# Altium PCB Phaser.PcbDoc (part 9 of 16)
Units mm, origin at the board's own origin, x right, y up, seen from the top; angles counter-clockwise.
Board outline 161.99 x 100 mm, 6 copper layers (TopLayer, MidLayer1, MidLayer2, SignalLayer1, Internal Plane 1, BottomLayer), stack 1.528 mm thick; 1017 components, 665 nets, 3453 pads, 2223 vias.
Unrouted connection lines stored in the file: 1.
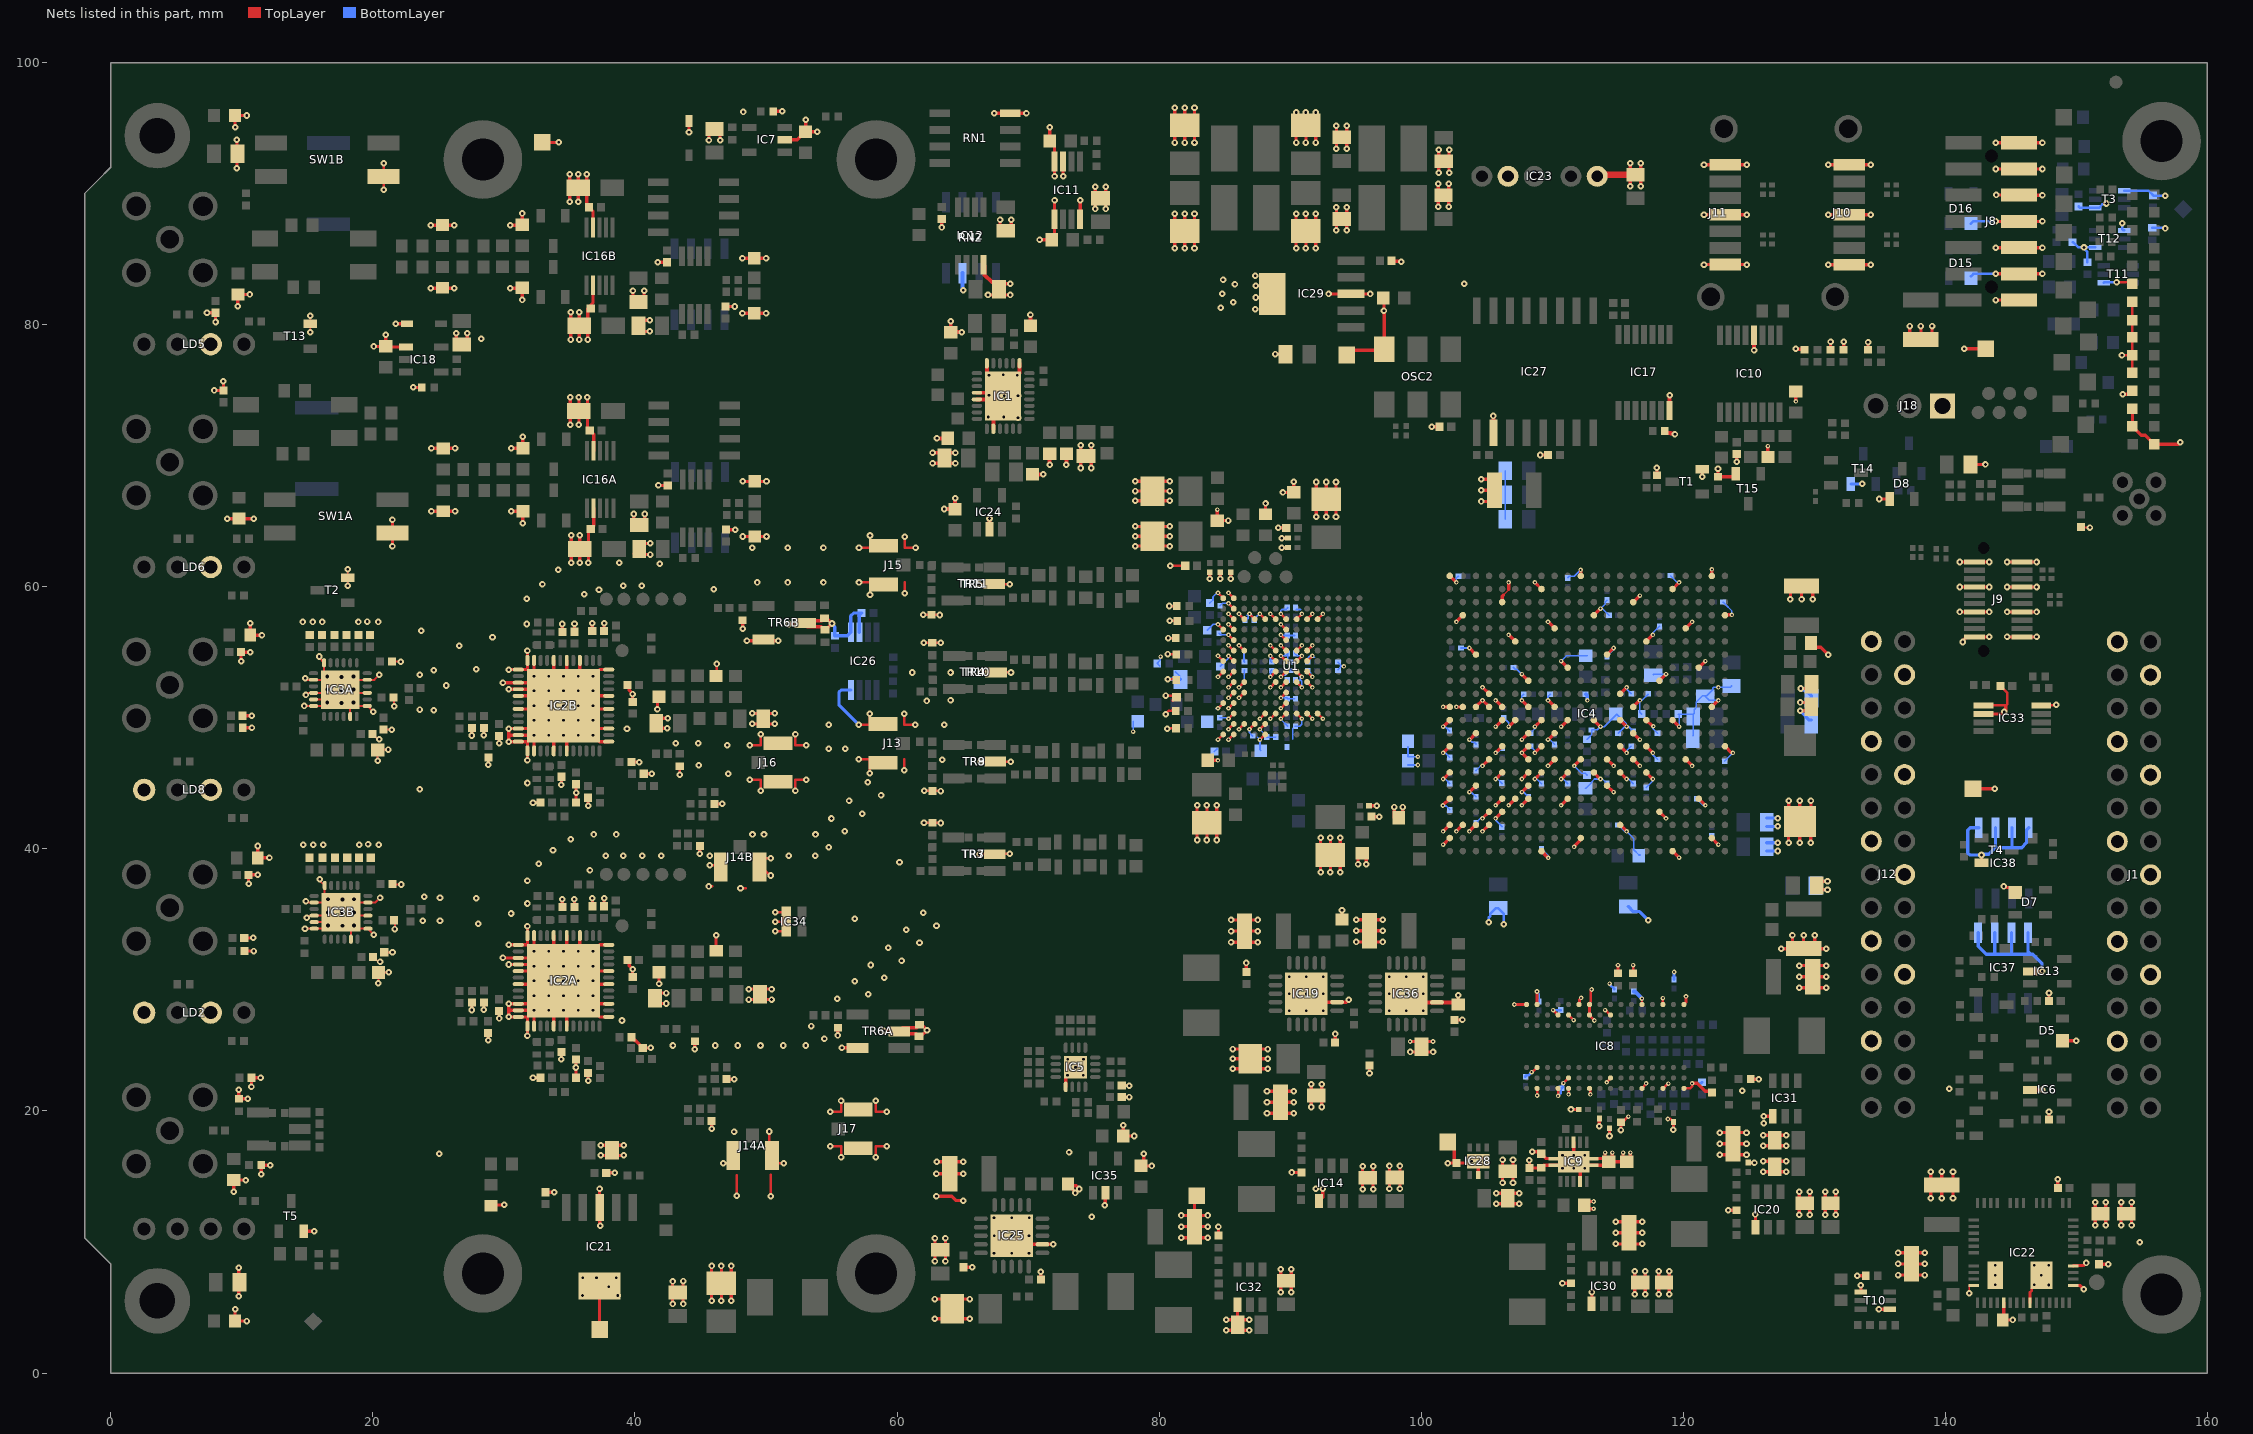
[diagram p11: the nets of this part, all layers, seen from the top]

## Via types
v1: diameter 0.5, hole 0.2, TopLayer to BottomLayer, tented both sides, 1374 vias
v2: diameter 0.35, hole 0.15, TopLayer to BottomLayer, tented both sides, 728 vias
v3: diameter 0.5, hole 0.2, TopLayer to BottomLayer, tented top, 96 vias
v4: diameter 0.6, hole 0.3, TopLayer to BottomLayer, 18 vias
v5: diameter 0.5, hole 0.2, TopLayer to BottomLayer, 5 vias
v6: diameter 0.35, hole 0.15, TopLayer to BottomLayer, 1 vias
v7: diameter 0.8, hole 0.5, TopLayer to BottomLayer, tented both sides, 1 vias

## Nets (pads, with @x,y where several pads share a name; then routed paths per layer and width w, separated by ;. In a path a pad name is that pad's centre, name@x,y a point inside that pad or via, vN(x,y) a via of type N, cw(c..) or ccw(c..) an arc to the next point about the centre after c; other vN are vias at no path point) (continued)
GND: C6.1 C7.1 C10.1 C11.2 C14A.1 C14B.1 C15A.1 C15B.1 C16A.1 C16B.1 C17.1 C18.1 C19.1 C20.1 C21.1 C22A.1 C22B.1 C23A.1 C23B.1 C24A.1 C24B.1 C25.2 C28.1 C30A.1 C30B.1 C31.2 C32.2 C33.2 C34.1 C35.2 C37.2 C38.1 C39.1 C40.1 C41.1 C42.1 C44A.1 C44B.1 C45A.1 C45B.1 C46A.1 C46B.1 C47.1 C48.1 C55.1 C56.1 C57.1 C58.1 C59.1 C60.1 C61.1 C62.1 C63.1 C64.1 C65.1 C66.1 C67.1 C68.1 C69.2 C70.1 C71.1 C72.1 C73.1 C74.1 C75.1 C76.1 C77.1 C78.1 C79.1 C82.1 C83.1 C84.1 C85.1 C86.1 C87.1 C88.1 C89.1 C90.1 C91.2 C92.1 C93.1 C94.1 C95.1 C96.1 C97.1 C98.1 C99.1 C100.1 C101.1 C102.1 C103.1 C104.1 C105.1 C106.1 C107.1 C108.1 C109.1 C110.1 C111.1 C112.1 C113.1 C114.1 C115.1 C116.1 C117.1 C118.1 C119.1 C120.1 C121.1 C122.1 C123.1 C124.1 C125.1 C126A.1 C126B.1 C127A.1 C127B.1 C128A.1 C128B.1 C129A.1 C129B.1 C130A.1 C130B.1 C131.1 C132.1 C134A.1 C134B.1 C139.1 C143.1 C144.1 C145.1 C146.1 C147.1 C148.1 C149.1 C153A.1 C153B.1 C154A.1 C154B.1 C155.1 C156.2 C158.1 C159.1 C160.2 C161.1 C162.1 C163.1 C164.1 C165.1 C166.1 C167.1 C168.1 C169.1 C170.1 C171.1 C172.1 C173.1 C174.1 C175.1 C176.1 C177.1 C178.1 C179.1 C180.2 C181.1 C182.1 C183.1 C184.2 C191.1 C195.1 C207.1 C208.1 C209.1 C210.1 C212.1 C213.1 C214.1 C215.1 C216.1 C217.1 C218.1 C219.1 C220.1 C221A.1 C221B.1 C223A.1 C223B.1 C224A.1 C224B.1 C225A.1 C225B.1 C227A.2 C227B.2 C228A.2 C228B.2 C229A.1 C229B.1 C230A.1 C230B.1 C231A.1 C231B.1 C232.1 C233.1 C234A.1 C234B.1 C235.1 C238.1 C239A.1 C239B.1 C240.1 C241A.1 C241B.1 C242.1 C243.2 C244.2 C245.1 C247.1 C248.1 C249.1 C250.2 C251.1 C252.1 C253.1 C255.2 C256.1 C257.1 C258.1 C259.1 C260.1 C262.1 C263.1 C264.1 C265.2 C266.1 C267.1 C268.1 C269.1 C271.1 C273A.1 C273B.1 C274A.1 C274B.1 C275A.1 C275B.1 C276A.1 C276B.1 C277A.1 C277B.1 C278.1 C279.1 C280A.1 C280B.1 C281A.2 C281B.2 C282A.1 C282B.1 C284A.1 C284B.1 C285A.1 C285B.1 C286A.1 C286B.1 C287A.1 C287B.1 C288A.1 C288B.1 C289A.1 C289B.1 C290.1 C291.1 C292.1 C293.1 C294.1 C295.1 C296.1 C297.1 C298.1 C299.1 C300.1 C301.2 C302.1 C303.1 C304.1 C305.2 C306.1 C307.1 C308.1 C309.1 C310.1 C311.1 C312.1 C313.1 C314.1 C315.1 C316.1 C317.1 C318.1 C319.2 C320.1 C321.1 C322.1 C323.1 C324.1 C325.1 C326.1 C327.1 C328.1 C329.1 C331.1 C332.1 C334.1 C335.1 C336.1 C337.1 C338.1 C339.1 C340.1 C342.1 C343.1 C344.1 C346.1 C347.1 C348.1 C349.1 C350.2 C351.1 C352.2 C353.1 C356A.1 C356B.1 C357A.1 C357B.1 C358A.1 C358B.1 C361.1 C364.2 C365.1 C366.1 C367.1 C371A.1 C371B.1 C372A.1 C372B.1 C373A.1 C373B.1 C374A.1 C374B.1 C375A.1 C375B.1 C376A.1 C376B.1 C377A.1 C377B.1 C1009.1 D3.1 D5.1 D6.2 D7.1 D8.1 D15.1 D16.1 IC1.4 IC1.5 IC1.10 IC1.23 IC1.28 IC1.29 IC2A.4 IC2A.6 IC2A.8 IC2A.11 IC2A.12 IC2A.13 IC2A.15 IC2A.16 IC2A.17 IC2A.19 IC2A.22 IC2A.23 IC2A.24 IC2A.25 IC2A.26 IC2A.29 IC2A.31 IC2A.37 IC2A.39 IC2A.42 IC2A.44 IC2A.48 IC2A.49 IC2B.4 IC2B.6 IC2B.8 IC2B.11 IC2B.12 IC2B.13 IC2B.15 IC2B.16 IC2B.17 IC2B.19 IC2B.22 IC2B.23 IC2B.24 IC2B.25 IC2B.26 IC2B.29 IC2B.31 IC2B.37 IC2B.39 IC2B.42 IC2B.44 IC2B.48 IC2B.49 IC3A.1 IC3A.3 IC3A.5 IC3A.12 IC3A.14 IC3A.16 IC3A.17 IC3A.18 IC3A.23 IC3A.25 IC3B.1 IC3B.3 IC3B.5 IC3B.12 IC3B.14 IC3B.16 IC3B.17 IC3B.18 IC3B.23 IC3B.25 IC4.A2 IC4.A3 IC4.A5 IC4.A7 IC4.A9 IC4.A11 IC4.A12 IC4.A22 IC4.AA2 IC4.AA12 IC4.AA22 IC4.AB9 IC4.AB19 IC4.B3 IC4.B12 IC4.B19 IC4.C3 IC4.C6 IC4.C10 IC4.C12 IC4.C16 IC4.D3 IC4.D4 IC4.D8 IC4.D12 IC4.D13 IC4.E4 IC4.E5 IC4.E7 IC4.E9 IC4.E11 IC4.E12 IC4.E20 IC4.F5 IC4.F11 IC4.F17 IC4.G5 IC4.G6 IC4.G7 IC4.G8 IC4.G9 IC4.G10 IC4.G12 IC4.G14 IC4.H1 IC4.H7 IC4.H9 IC4.H11 IC4.H21 IC4.J8 IC4.J10 IC4.J12 IC4.J18 IC4.K5 IC4.K7 IC4.K11 IC4.K15 IC4.L2 IC4.L8 IC4.L22 IC4.M7 IC4.M11 IC4.M19 IC4.N6 IC4.N8 IC4.N16 IC4.P3 IC4.P7 IC4.P9 IC4.P11 IC4.P13 IC4.R8 IC4.R10 IC4.R12 IC4.R20 IC4.T7 IC4.T9 IC4.T11 IC4.T17 IC4.U4 IC4.U14 IC4.V1 IC4.V11 IC4.V21 IC4.W8 IC4.W18 IC4.Y5 IC4.Y15 IC5.1 IC5.17 IC6.2 IC7.2 IC8.A9 IC8.B1 IC8.B3 IC8.B9 IC8.D1 IC8.D8 IC8.E1 IC8.E2 IC8.E8 IC8.F9 IC8.G1 IC8.G8 IC8.G9 IC8.J2 IC8.J8 IC8.M1 IC8.M9 IC8.P1 IC8.P9 IC8.T1 IC8.T9 IC9.4 IC9.8 IC9.11 IC10.4 IC11.3 IC11.4 IC11.5 IC11.8 IC12.4 IC13.2 IC14.1 IC16A.2 IC16A.9 IC16B.2 IC16B.9 IC17.7 IC18.1 IC19.12 IC19.21 IC20.1 IC21.3 IC21.6 IC22.26 IC22.31 IC22.35 IC22.42 IC22.45 IC22.53 IC22.54 IC23.1 IC23.4 IC24.2 IC25.12 IC25.21 IC26.4 IC26.5 IC26.6 IC27.10 IC28.5 IC28.7 IC29.3 IC29.6 IC30.1 IC31.1 IC32.1 IC33.4 IC33.5 IC33.6 IC34.3 IC35.2 IC36.12 IC36.21 IC37.1 IC37.2 IC37.3 IC37.4 IC38.1 IC38.2 IC38.3 IC38.4 J1.1 J1.4 J1.7 J1.10 J1.13 J1.16 J1.19 J1.22 J1.25 J8.1 J8.3 J8.5 J8.7 J8.9 J8.11 J8.13 J9.1 J9.2 J9.7 J9.8 J9.13 J9.14 J9.19 J9.20 J10.1 J10.4 J10.7 J11.1 J11.4 J11.7 J12.1 J12.4 J12.7 J12.10 J12.13 J12.16 J12.19 J12.22 J12.25 J13.2 J14A.2 J14B.2 J15.2 J16.2 J17.2 J18.1 L5.1 LD2.1 LD2.3 LD4.1 LD5.3 LD6.3 LD8.1 LD8.3 LD11.1 LD14.1 LD15.1 LD16.1 LD17.1 LD18.1 LD19.1 LD20.1 LD21.2 OSC2.3 R11.2 R12.2 R13.2 R14.1 R15.2 R16.2 R19.1 R21.2 R23.1 R24.2 R27.1 R31.2 R35.2 R36.2 R43.1 R48.1 R51A.1 R51B.1 R75.1 R80.1 R81.1 R87.2 R91.1 R122.1 R123.1 R124.1 R125.1 R126.1 R129.1 R135.2 R137A.1 R137B.1 R150.1 R151.1 R156.1 R157.1 R158.1 R159.1 R160.1 R161.1 R164.1 R168.1 R177.1 R178.1 R181.1 R184.2 R186.2 R189.2 R190.2 R192.2 R193A.1 R193B.1 R196A.1 R196B.1 R197.2 R199.2 R201.2 R203.1 R206.1 R209.1 R222.1 R226A.2 R226B.2 R238.1 R239.1 R241.2 R242.2 R243.2 R244.1 R250.1 R251.1 R253.1 R254.1 R256.1 R258.2 R261.2 R263.2 R264.2 R265.2 R266.2 R267.2 R268.2 RN1.4 RN2.7 SW1A.3 SW1B.3 T1.2 T2.2 T3.1 T3.4 T4.2 T5.2 T10.1 T10.4 T11.4 T12.1 T12.4 T13.2 T14.2 T15.2 TP12.1 TP17.1 TP19.1 TP20.1 TP21.1 TP22.1 TP23.1 TR3.2 TR4.2 TR5.2 TR6A.2 TR6A.4 TR6B.2 TR6B.4 TR7.2 TR8.2 TR9.2 TR10.2 TR11.2 U1.A10 U1.A13 U1.A14 U1.B10 U1.B11 U1.B12 U1.B13 U1.C5 U1.C6 U1.C7 U1.C8 U1.C9 U1.C10 U1.C13 U1.D8 U1.D13 U1.D14 U1.E8 U1.E12 U1.E13 U1.F6 U1.F7 U1.F8 U1.F9 U1.F12 U1.F13 U1.G6 U1.G7 U1.G8 U1.G9 U1.G13 U1.G14 U1.H6 U1.H7 U1.H8 U1.H9 U1.H13 U1.H14 U1.J6 U1.J7 U1.J8 U1.J9 U1.J12 U1.J13 U1.K8 U1.K13 U1.L8 U1.L13 U1.L14 U1.M5 U1.M6 U1.M7 U1.M8 U1.M9 U1.M10 U1.M11 U1.M12 U1.M13 U1.N13 U1.P13 U1.P14 | length 1164.1
  TopLayer w0.075: 106.277,59.381 106.681,59.784
  TopLayer w0.125: R196A.1@46.192,32.277 46.225,32.245 R196A.1@46.207,32.227 ; v2@103.689,48.296 v2@103.689,48.317 ; IC4.C10@104.175,48.804 IC4.C10@104.175,48.825 ; IC4.E20@106.175,58.825 IC4.E20@106.183,58.833 ; 112.045,40.587 112.045,40.593 ; IC8.M9@116.841,28.12 v2(116.841,28.57) ; v1(141.825,6.075) 141.825,6.7 141.85,6.675 IC22.26@142.15,6.675 ; R27.1@150.343,64.554 150.381,64.516 v1(151.025,64.516)
  TopLayer w0.127: v1(15.225,79.422) T13.2@15.225,80.052 v1(15.225,80.682) ; v1(18.079,60.063) T2.2@18.079,60.693 v1(18.079,61.323)
  TopLayer w0.152: v1@14.735,51.79 v1@14.75,51.775 ; v1@14.747,52.959 14.806,52.9 IC3A.14@15.475,52.9 16.037,52.9 ; v1(14.775,50.9) IC3A.18@15.475,50.9 16.275,50.9 v4(16.525,51.15) IC3A.25@16.775,51.4 ; v1@14.785,34.794 v1@14.8,34.779 ; v1@14.797,35.963 14.856,35.904 IC3B.14@15.525,35.904 16.087,35.904 ; v1(14.825,33.904) IC3B.18@15.525,33.904 16.325,33.904 v4(16.575,34.154) IC3B.25@16.825,34.404 ; v1(14.899,51.74) 14.785,51.74 v1@14.75,51.775 ; v1(14.949,34.744) 14.835,34.744 v1@14.8,34.779 ; IC3A.17@15.475,51.4 IC3A.25@16.775,51.4 ; IC3B.17@15.525,34.404 IC3B.25@16.825,34.404 ; v1(15.9,54.675) 15.9,54.575 IC3A.12@16.275,54.2 16.275,53.4 v4(16.525,53.15) IC3A.25@17.525,52.15 IC3A.25@17.55,52.125 ; v1(15.95,37.679) 15.95,37.579 IC3B.12@16.325,37.204 16.325,36.404 v4(16.575,36.154) IC3B.25@17.575,35.154 IC3B.25@17.6,35.129 ; IC3A.23@18.275,50.1 18.275,51.4 17.625,52.05 v4(17.625,52.125) ; IC3B.23@18.325,33.104 18.325,34.404 17.675,35.054 v4(17.675,35.129) ; 19.013,50.9 IC3A.1@19.575,50.9 v1(20.025,50.45) ; 19.013,51.9 IC3A.3@19.575,51.9 ; 19.063,33.904 IC3B.1@19.625,33.904 v1(20.075,33.454) ; 19.063,34.904 IC3B.3@19.625,34.904 ; C23A.1@19.975,48.75 20,48.75 v1@20.375,48.375 ; C23B.1@20.025,31.754 20.05,31.754 v1@20.425,31.379 ; v1(20.375,46.725) C277A.1@20.375,47.55 20.4,47.575 v1(21.175,47.575) ; v1(20.425,29.729) C277B.1@20.425,30.554 20.45,30.579 v1(21.225,30.579) ; v1@20.426,48.324 v1@20.375,48.375 ; v1@20.476,31.327 v1@20.425,31.379 ; v1(20.5,48.375) v1@20.375,48.375 ; v1(20.5,53.275) 20.125,52.9 IC3A.5@19.575,52.9 18.275,52.9 17.625,52.25 v4(17.625,52.125) ; v1(20.55,31.379) v1@20.425,31.379 ; v1(20.55,36.279) 20.175,35.904 IC3B.5@19.625,35.904 18.325,35.904 17.675,35.254 v4(17.675,35.129) ; C22A.1@20.825,49.1 v1(21.45,49.1) ; C22B.1@20.875,32.104 v1(21.5,32.104) ; C371A.1@21.45,54.3 21.475,54.275 v1(22.125,54.275) ; C371B.1@21.5,37.304 21.525,37.279 v1(22.175,37.279) ; C24A.1@21.575,51.55 21.625,51.5 v1(21.625,50.875) ; C24B.1@21.625,34.554 21.675,34.504 v1(21.675,33.879) ; R242.2@131.231,78.087 R242.2@131.236,78.091 ; v1@14.75,51.775 14.85,51.875 15.45,51.875 IC3A.16@15.475,51.9 IC3A.25@17.275,51.9 ; v1@14.8,34.779 14.9,34.879 15.5,34.879 IC3B.16@15.525,34.904 IC3B.25@17.325,34.904 ; IC3A.25@16.775,51.4 IC3A.25@17.275,51.9 ; IC3B.25@16.825,34.404 IC3B.25@17.325,34.904 ; IC3A.25@17.275,51.9 17.5,52.125 IC3A.25@17.55,52.125 ; IC3B.25@17.325,34.904 17.55,35.129 IC3B.25@17.6,35.129 ; IC3A.25@17.55,52.125 v4(17.625,52.125) ; IC3B.25@17.6,35.129 v4(17.675,35.129)
  TopLayer w0.19: v1(43.422,45.655) R226B.2@43.422,46.313 ; v1(45.623,37.129) 45.916,37.129 ; v1(45.718,38.754) J14B.2@46.554,38.754 ; R196B.1@46.199,53.182 46.244,53.227 v1(46.244,54.107) ; v1(46.739,16) J14A.2@47.575,16 ; J14A.2@47.563,16.737 J14A.2@47.575,16.725 ; v1(47.767,13.535) 47.767,15.082 ; v1(48.057,36.982) 48.457,36.982 ; v1(48.772,45.265) 49.608,45.265 v1(49.608,44.43) ; v1(48.772,47.905) 49.608,47.905 v1(49.608,48.741) ; J14B.2@49.504,38.754 50.294,37.964 v1(50.376,37.964) ; J14B.2@49.711,39.272 v1(50.37,39.272) ; J14A.2@50.25,17 v1(50.25,18.428) ; v1(50.37,13.495) 50.37,15.12 ; J14A.2@50.525,16 v1(51.361,16) ; v1(50.714,33.716) IC34.3@51.55,33.716 ; v1(50.714,34.441) IC34.3@51.55,34.441 ; v1(50.714,35.167) IC34.3@51.55,35.167 ; v1(52.248,44.43) 52.248,45.265 v1(53.084,45.265) ; v1(52.248,48.741) 52.248,47.905 v1(53.084,47.905) ; v1(54.891,17.305) 55.727,17.305 v1(55.727,16.469) ; v1(54.891,19.945) 55.727,19.945 v1(55.727,20.78) ; v1(57.076,46.826) 57.912,46.826 v1(57.912,45.771) ; v1(57.076,49.466) 57.912,49.466 v1(57.912,50.302) ; v1(57.1,60.326) 57.935,60.326 57.937,60.324 v1(57.937,59.385) ; v1(57.1,62.966) 57.935,62.966 57.937,62.968 v1(57.937,63.906) ; v1(58.367,16.469) 58.367,17.305 v1(59.203,17.305) ; v1(58.367,20.78) 58.367,19.945 v1(59.203,19.945) ; v1(60.552,45.991) 60.552,46.826 ; v1(60.552,50.302) 60.552,49.466 v1(61.388,49.466) ; v1(60.575,59.49) 60.575,60.326 ; v1(60.575,63.802) 60.575,62.966 v1(61.411,62.966) ; v1@62.002,57.848 R254.1@62.633,57.848 v1@63.265,57.848 ; v1@62.055,55.728 R253.1@62.686,55.728 v1@63.318,55.728 ; v1@62.064,41.974 R250.1@62.696,41.974 v1@63.327,41.974 ; v1@62.08,44.412 R251.1@62.712,44.412 v1@63.343,44.412 ; v1(66.255,60.198) TR5.2@67.424,60.198 v1(68.593,60.198) ; v1(66.292,39.587) TR3.2@67.461,39.587 67.498,39.624 v1(68.605,39.624) ; v1(66.333,46.648) TR9.2@67.502,46.648 v1(68.671,46.648) ; v1(66.359,53.455) TR4.2@67.528,53.455 v1(68.696,53.455) ; v1@80.467,50.267 80.721,50.52 R258.2@81.263,50.52 ; v1(80.518,51.697) 81.158,51.697 R264.2@81.303,51.552 ; v1(80.668,54.863) 81.255,54.863 R265.2@81.3,54.818 ; v1(80.67,52.934) 81.253,52.934 R263.2@81.315,52.872 ; v1@80.71,56.079 R266.2@81.272,56.079 ; v1@80.781,58.522 R267.2@81.343,58.522 ; v1@80.799,49.188 R184.2@81.279,49.188 ; v1@80.811,57.391 R268.2@81.373,57.391 ; v1@80.838,61.6 C290.1@81.993,61.6 ; R15.2@81.267,51.562 81.037,51.332 81.037,51.311 R264.2@81.277,51.552 ; IC33.5@142.9,50.94 144.61,50.94 144.722,51.051 144.722,51.904 C353.1@144.2,52.425 ; IC33.4@147.3,50.94 147.321,50.961 148.438,50.961 v1(148.459,50.982) ; v1(153.054,83.243) 154.139,83.243 LD14.1@154.267,83.115 ; v1(153.467,77.674) LD17.1@154.267,77.674 ; v1(153.493,87.736) v1@153.493,87.761 ; LD18.1@154.267,76.314 LD17.1@154.267,77.674 ; LD15.1@154.267,81.755 LD4.1@154.267,80.34 LD16.1@154.267,79.019 LD17.1@154.267,77.674
  TopLayer w0.2: v1(20.825,90.303) SW1B.3@20.825,91.309 v1(20.825,92.315) ; v1(21.498,63.084) SW1A.3@21.498,64.09 v1(21.498,65.096) ; v2(84.493,48.325) U1.A14@84.893,48.725 ; v2(84.493,50.725) U1.D14@84.893,51.125 ; v2(84.493,53.125) U1.G14@84.893,53.525 ; v2(84.493,54.725) U1.H14@84.893,54.325 ; v2(84.493,57.125) U1.L14@84.893,56.725 ; v2(84.493,59.525) U1.P14@84.893,59.125 ; v2(85.293,48.325) U1.A13@85.693,48.725 ; v2(85.293,49.125) U1.B13@85.693,49.525 ; v2(85.293,49.925) U1.C13@85.693,50.325 ; v2(85.293,50.725) U1.D13@85.693,51.125 ; v2(85.293,51.525) U1.E13@85.693,51.925 ; v2(85.293,52.325) U1.F13@85.693,52.725 ; v2(85.293,53.125) U1.G13@85.693,53.525 ; v2(85.293,54.725) U1.H13@85.693,54.325 ; v2(85.293,55.525) U1.J13@85.693,55.125 ; v2(85.293,56.325) U1.K13@85.693,55.925 ; v2(85.293,57.125) U1.L13@85.693,56.725 ; v2(85.293,57.925) U1.M13@85.693,57.525 ; v2(85.293,58.725) U1.N13@85.693,58.325 ; v2(85.293,59.525) U1.P13@85.693,59.125 ; v2(86.093,49.125) U1.B12@86.493,49.525 ; v2(86.093,51.525) U1.E12@86.493,51.925 ; v2(86.093,52.325) U1.F12@86.493,52.725 ; v2(86.093,55.525) U1.J12@86.493,55.125 ; v2(86.093,57.925) U1.M12@86.493,57.525 ; v2(86.893,49.125) U1.B11@87.293,49.525 ; v2(86.893,57.925) U1.M11@87.293,57.525 ; v2(87.693,48.325) U1.A10@88.093,48.725 ; v2(87.693,49.125) U1.B10@88.093,49.525 ; v2(87.693,49.925) U1.C10@88.093,50.325 ; v2(87.693,57.925) U1.M10@88.093,57.525 ; v2(88.493,49.925) U1.C9@88.893,50.325 ; v2(88.493,52.325) U1.F9@88.893,52.725 ; v2(88.493,53.125) U1.G9@88.893,53.525 ; v2(88.493,54.725) U1.H9@88.893,54.325 ; v2(88.493,55.525) U1.J9@88.893,55.125 ; v2(88.493,57.925) U1.M9@88.893,57.525 ; v2(89.293,49.925) U1.C8@89.693,50.325 ; v2(89.293,50.725) U1.D8@89.693,51.125 ; v2(89.293,51.525) U1.E8@89.693,51.925 ; v2(89.293,52.325) U1.F8@89.693,52.725 ; v2(89.293,53.125) U1.G8@89.693,53.525 ; v2(89.293,54.725) U1.H8@89.693,54.325 ; v2(89.293,55.525) U1.J8@89.693,55.125 ; v2(89.293,56.325) U1.K8@89.693,55.925 ; v2(89.293,57.125) U1.L8@89.693,56.725 ; v2(89.293,57.925) U1.M8@89.693,57.525 ; U1.C7@90.493,50.325 v2(90.893,49.925) ; U1.F7@90.493,52.725 v2(90.893,52.325) ; U1.G7@90.493,53.525 v2(90.893,53.125) ; U1.H7@90.493,54.325 v2(90.893,54.725) ; U1.J7@90.493,55.125 v2(90.893,55.525) ; U1.M7@90.493,57.525 v2(90.893,57.925) ; U1.C6@91.293,50.325 v2(91.693,49.925) ; U1.F6@91.293,52.725 v2(91.693,52.325) ; U1.G6@91.293,53.525 v2(91.693,53.125) ; U1.H6@91.293,54.325 v2(91.693,54.725) ; U1.J6@91.293,55.125 v2(91.693,55.525) ; U1.M6@91.293,57.525 v2(91.693,57.925) ; U1.C5@92.093,50.325 v2(92.493,49.925) ; U1.M5@92.093,57.525 v2(92.493,57.925) ; v2(107.098,28.12) IC8.A9@108.041,28.12 ; v2(108.429,22.963) 108.484,22.963 IC8.B3@108.841,23.32 ; IC8.B9@108.829,28.132 v2(108.829,29.113) ; v2(108.841,21.179) IC8.B1@108.841,21.72 ; v2(110.065,27.696) IC8.D8@110.441,27.32 ; v2(110.441,21.154) IC8.D1@110.441,21.72 ; v2(110.84,22.119) IC8.E2@111.241,22.52 ; v2(111.241,21.27) IC8.E1@111.241,21.72 ; IC8.E8@111.241,27.32 v2(111.633,26.928) ; IC8.F9@112.041,28.12 112.079,28.158 112.079,28.472 112.2,28.593 v2(112.2,28.634) ; v2(112.905,21.262) IC8.G1@112.905,21.656 ; v2(113.005,29.263) 112.944,29.203 112.944,28.331 112.835,28.222 112.835,28.126 IC8.G9@112.841,28.12 112.841,27.277 v2(113.215,26.903) ; v2(114.03,27.688) 114.051,27.688 114.419,27.32 IC8.J8@114.441,27.32 ; v2(114.155,22.176) 114.165,22.186 114.165,22.217 114.441,22.493 IC8.J2@114.441,22.52 ; R122.1@115.015,30.498 v2(115.015,31.128) ; R126.1@115.24,19.133 115.345,19.133 115.774,19.562 v2(115.805,19.562) ; R125.1@116.165,30.498 v2(116.165,31.128) ; IC8.M1@116.841,21.72 117.165,22.044 v2@117.165,22.101 ; IC8.P1@118.41,21.689 118.415,21.684 118.819,22.088 v2(118.855,22.088) ; IC8.P1@118.435,21.714 IC8.P1@118.441,21.72 ; IC8.P9@118.441,28.12 v2(118.441,28.602) ; v2@118.815,19.393 v2(118.825,19.383) 119.01,19.383 C171.1@119.24,19.153 C171.1@119.242,19.155 ; IC8.T1@120.041,21.72 120.504,21.72 120.665,21.881 v2(120.665,22.103) ; IC8.T9@120.09,28.169 120.205,28.284 v2(120.205,28.738) ; T4.2@142.75,38.925 v1(142.75,39.53) ; IC22.35@146.45,5.375 146.45,6.152 146.575,6.277 146.575,6.42
  TopLayer w0.25: v1(7.348,80.892) 7.352,80.896 7.994,80.896 7.998,80.892 v1(7.998,80.2) ; v1(7.909,74.975) C31.2@8.601,74.975 v1(8.601,75.667) ; v1(8.891,65.194) v1(10.914,65.194) R157.1@9.791,65.194 ; v1(9.39,13.822) R14.1@9.39,14.722 v1(10.29,14.722) ; v1(9.49,4.868) R161.1@9.49,3.968 v1(10.39,3.968) ; v1(9.49,95.056) R159.1@9.49,95.956 v1(10.39,95.956) ; v1(9.631,91.945) v1(9.631,94.105) ; v1(9.7,81.4) R156.1@9.7,82.3 v1(10.6,82.3) ; v1(9.775,5.859) v1(9.775,8.02) ; v1(9.775,21.612) R81.1@9.775,20.92 v1(10.467,20.92) ; v1(9.948,54.315) C34.1@9.948,55.007 v1(10.64,55.007) ; C33.2@10.065,50.15 v1(10.757,50.15) ; R151.1@10.085,49.236 v1(10.777,49.236) ; C41.1@10.191,33.2 v1(10.884,33.2) ; R75.1@10.211,32.2 v1(10.904,32.2) ; v1(10.52,37.322) C35.2@10.52,38.015 v1(11.212,38.015) ; v1(10.64,57.206) R158.1@10.64,56.306 v1(11.54,56.306) ; v1(10.74,21.836) C37.2@10.74,22.528 v1(11.433,22.528) ; v1(11.212,40.214) R160.1@11.212,39.314 v1(12.112,39.314) ; v1(11.49,15.173) R150.1@11.49,15.865 v1(12.182,15.865) ; T5.2@14.725,10.825 v1(15.525,10.825) ; v1(20.084,78.333) C252.1@20.984,78.333 ; v1(20.984,79.233) C252.1@20.984,78.333 ; v1(21.759,80.058) D3.1@22.609,80.058 ; IC18.1@22.534,78.283 21.034,78.283 C252.1@20.984,78.333 ; v1(23.084,75.208) R80.1@23.739,75.208 ; v1(24.425,82.78) v1(26.225,82.78) ; v1(24.425,87.58) v1(26.225,87.58) ; v1(24.475,65.755) R137A.1@25.375,65.755 v1(26.275,65.755) ; v1(24.475,70.555) R51A.1@25.375,70.555 v1(26.275,70.555) ; v1(26.359,79.328) 26.359,78.908 C366.1@26.784,78.483 ; C366.1@27.159,78.108 C366.1@26.784,78.483 ; C366.1@27.159,78.858 C366.1@26.784,78.483 ; v1(27.209,79.328) 27.209,78.908 C366.1@26.784,78.483 ; v1(27.555,27.702) C288A.1@27.555,28.264 ; v1(27.555,48.649) C288B.1@27.555,49.211 ; v1(28.475,27.713) C153A.1@28.475,28.275 ; v1(28.475,48.66) C153B.1@28.475,49.221 ; v1(28.798,25.384) C289A.1@28.798,25.945 ; v1(28.819,46.405) C289B.1@28.819,46.966 ; R87.2@29.017,12.766 29.079,12.827 v1(30.041,12.827) ; v1(29.637,48.058) C154B.1@29.637,48.619 ; v1(29.646,27.056) C154A.1@29.646,27.617 ; v1(29.93,31.675) IC2A.15@31.1,31.675 IC2A.49@34.3,31.675 ; v1(29.93,52.675) IC2B.15@31.1,52.675 IC2B.49@34.3,52.675 ; 30.375,27.675 IC2A.23@31.1,27.675 IC2A.49@31.798,27.675 ; v1(30.375,31.175) IC2A.16@31.1,31.175 IC2A.49@34.3,31.175 ; v1(30.375,32.675) IC2A.13@31.1,32.675 31.798,32.675 IC2A.49@32.121,32.352 ; v1(30.375,52.175) IC2B.16@31.1,52.175 IC2B.49@33.425,52.175 ; v1(30.375,53.675) IC2B.13@31.1,53.675 IC2B.49@31.798,53.675 ; v1(30.5,82.78) 31.4,82.78 v1(31.4,81.88) ; v1(30.5,87.58) 31.4,87.58 v1(31.4,88.48) ; v1(30.55,65.755) C225A.1@31.45,65.755 v1(31.45,64.855) ; v1(30.55,70.555) C221A.1@31.45,70.555 v1(31.45,71.455) ; IC2A.19@31.1,29.675 34.3,29.675 v3(34.55,29.925) ; IC2A.17@31.1,30.675 IC2A.49@34.3,30.675 ; IC2B.19@31.1,50.675 IC2B.49@34.3,50.675 ; IC2B.17@31.1,51.675 IC2B.49@34.3,51.675 ; IC2A.49@31.798,27.175 IC2A.24@31.1,27.175 v1(30.375,27.175) v1(30.375,28.175) IC2A.22@31.1,28.175 IC2A.49@31.798,28.175 ; IC2B.49@31.798,48.175 IC2B.24@31.1,48.175 v1(30.375,48.175) v1(30.375,49.175) ; IC2B.49@31.798,48.675 IC2B.23@31.1,48.675 30.375,48.675 v1(30.375,49.175) ; IC2B.49@31.798,49.175 IC2B.22@31.1,49.175 v1(30.375,49.175) ; v1(31.8,25.75) IC2A.25@31.8,26.475 IC2A.49@31.8,27.173 ; IC2A.49@31.8,32.677 IC2A.12@31.8,33.375 v1(31.8,34.1) ; v1(31.8,46.75) IC2B.25@31.8,47.475 IC2B.49@31.8,48.173 ; IC2B.49@31.8,53.677 IC2B.12@31.8,54.375 v1(31.8,55.1) ; v1(32.221,43.527) C358B.1@32.782,43.527 ; v1(32.222,22.528) C358A.1@32.783,22.528 ; IC2A.26@32.3,26.475 IC2A.49@32.3,27.173 ; IC2A.49@32.3,32.677 IC2A.11@32.3,33.375 ; IC2B.26@32.3,47.475 IC2B.49@32.3,48.173 ; IC2B.49@32.3,53.677 IC2B.11@32.3,54.375 ; TP12.1@32.927,93.904 v1(34.175,93.904) ; C267.1@33.169,13.791 v1(33.854,13.791) ; IC2A.29@33.8,26.475 IC2A.49@33.8,27.173 ; IC2A.49@33.8,32.677 IC2A.8@33.8,33.375 ; IC2B.29@33.8,47.475 IC2B.49@33.8,48.173 ; IC2B.49@33.8,53.677 IC2B.8@33.8,54.375 ; v1(34.39,23.941) C357A.1@34.39,24.503 ; v1(34.39,44.903) C357B.1@34.39,45.503 ; C134A.1@34.461,35.557 v1(34.461,36.157) ; C134B.1@34.461,56.557 v1(34.461,57.157) ; IC2A.31@34.8,26.475 IC2A.49@34.8,27.173 ; IC2A.49@34.8,32.677 IC2A.6@34.8,33.375 ; IC2B.31@34.8,47.475 IC2B.49@34.8,48.173 ; IC2B.49@34.8,53.677 IC2B.6@34.8,54.375 ; v1(35.025,89.385) v1(35.025,91.475) ; v1(35.075,72.36) v1(35.075,74.45) ; v1(35.1,78.86) v1(35.1,80.95) ; v1(35.15,61.835) v1(35.15,63.925) ; C45A.1@35.382,35.557 v1(35.382,36.157) ; C45B.1@35.391,56.566 v1(35.391,57.166) ; C127A.1@35.5,23.915 v1(35.5,23.315) 35.51,23.305 C356A.1@35.51,22.533 ; C356B.1@35.51,43.533 v1(35.509,44.275) ; v1(35.509,44.275) C127B.1@35.509,44.875 ; v1(35.675,89.385) C228B.2@35.675,90.43 v1(35.675,91.475) ; v1(35.725,72.36) C228A.2@35.725,73.405 v1(35.725,74.45) ; v1(35.75,78.86) C231B.1@35.75,79.905 v1(35.75,80.95) ; IC2A.49@35.8,32.677 IC2A.4@35.8,33.375 ; IC2B.49@35.8,53.677 IC2B.4@35.8,54.375 ; v1(35.8,61.835) C231A.1@35.8,62.88 v1(35.8,63.925) ; v1(36.325,91.475) 36.325,89.13 C229B.1@36.5,88.955 36.8,88.655 IC16B.9@36.8,87.405 ; v1(36.375,74.45) 36.375,72.105 C229A.1@36.55,71.93 36.85,71.63 IC16A.9@36.85,70.38 ; v1(36.4,78.86) 36.4,81.205 C230B.1@36.575,81.38 ; v1(36.424,22.297) C128A.1@36.424,22.897 ; v1(36.424,43.297) C128B.1@36.424,43.897 ; v1(36.45,61.835) 36.45,64.18 C230A.1@36.625,64.355 ; C230B.1@36.575,81.43 36.8,81.655 IC16B.2@36.8,83.005 ; C230A.1@36.625,64.405 36.85,64.63 IC16A.2@36.85,65.98 ; C130B.1@36.748,56.607 v1(36.748,57.208) ; C130A.1@36.754,35.614 v1(36.754,36.214) ; v1(37.3,14.05) IC21.3@37.3,12.639 37.323,12.616 37.323,11.248 v1(37.346,11.225) ; TP19.1@37.302,3.323 IC21.6@37.302,6.359 ; IC2A.49@37.302,27.175 IC2A.37@38,27.175 ; IC2A.49@37.302,28.175 IC2A.39@38,28.175 ; IC2A.49@37.302,29.675 IC2A.42@38,29.675 ; IC2A.49@37.302,30.675 IC2A.44@38,30.675 ; IC2A.49@37.302,32.675 IC2A.48@38,32.675 ; IC2B.49@37.302,48.175 IC2B.37@38,48.175 ; IC2B.49@37.302,49.175 IC2B.39@38,49.175 ; IC2B.49@37.302,50.675 IC2B.42@38,50.675 ; IC2B.49@37.302,51.675 IC2B.44@38,51.675 ; IC2B.49@37.302,53.675 IC2B.48@38,53.675 ; v1(37.385,16.606) v1(39.135,16.606) ; v1(37.385,17.39) v1(39.135,17.39) ; C129A.1@37.648,35.62 v1(37.648,36.22) ; C129B.1@37.648,56.62 v1(37.648,57.22) ; C266.1@37.81,15.275 v1(38.451,15.275) ; C126A.1@39.421,31.511 39.571,31.361 39.571,31.082 39.818,30.836 39.818,30.462 39.95,30.33 C44A.1@39.835,30.215 ; C126B.1@39.421,52.511 39.571,52.361 39.571,52.082 39.818,51.836 v1(39.818,51.811) 39.818,51.462 39.95,51.33 C44B.1@39.835,51.215 ; C286A.1@39.727,25.619 39.912,25.434 39.972,25.434 40.073,25.333 40.095,25.333 40.22,25.208 40.22,25.185 C287A.1@40.596,24.809 v1(41.196,24.809) ; C286B.1@39.727,46.619 v1(40.327,46.619) ; v1(39.85,82.575) 39.85,82.155 C223B.1@40.275,81.73 40.7,82.155 v1(40.7,82.575) ; v1(39.9,65.55) 39.9,65.13 C223A.1@40.325,64.705 40.75,65.13 v1(40.75,65.55) ; C234B.1@39.9,79.53 C234B.1@40.275,79.905 ; C234A.1@39.95,62.505 C234A.1@40.325,62.88 ; C234B.1@40.65,79.53 C234B.1@40.275,79.905 ; C287B.1@40.676,45.729 v1(41.276,45.729) ; C234A.1@40.7,62.505 C234A.1@40.325,62.88 ; v1(41.12,79.48) 40.7,79.48 C234B.1@40.275,79.905 ; v1(41.12,80.33) 40.7,80.33 C234B.1@40.275,79.905 ; v1(41.17,62.455) 40.75,62.455 C234A.1@40.325,62.88 ; v1(41.17,63.305) 40.75,63.305 C234A.1@40.325,62.88 ; C285A.1@41.527,28.196 v1(42.377,28.196) ; C285A.1@41.527,28.996 v1(42.377,28.996) ; C285B.1@41.625,49.193 v1(42.475,49.193) ; C285B.1@41.649,49.97 v1(42.499,49.97) ; v1(41.719,50.661) C282B.1@41.719,51.532 ; v1(41.745,84.755) C241B.1@42.45,84.755 ; v1(41.795,67.73) C241A.1@42.5,67.73 ; v1(41.839,29.719) C282A.1@41.839,30.59 ; v1(42.875,5.27) v1@42.875,7.02 ; v1(43.675,5.27) v1(43.675,7.02) ; v1(44.125,94.675) D6.2@44.125,95.525 ; v1(44.575,24.705) R226A.2@44.575,25.305 ; v1(44.954,39.629) C30B.1@44.954,40.229 ; v1(45.65,94.08) 45.65,94.5 C179.1@46.075,94.925 ; C179.1@45.7,94.55 C179.1@46.075,94.925 ; C179.1@45.7,95.3 C179.1@46.075,94.925 ; v1(45.848,5.521) v1(45.848,8.171) ; v1(45.854,18.629) C30A.1@45.854,19.229 ; C46B.1@46.066,43.425 v1(46.666,43.425) ; R196A.1@46.192,32.277 v1(46.192,33.392) ; v1(46.5,94.08) 46.5,94.5 C179.1@46.075,94.925 ; v1(46.598,5.521) C156.2@46.598,6.846 v1(46.598,8.171) ; C239B.1@46.9,81.38 v1(47.605,81.38) ; C239A.1@46.95,64.355 v1(47.655,64.355) ; C46A.1@46.991,22.425 v1(47.591,22.425) ; v1(47.348,5.521) v1(47.348,8.171) ; v1(48.204,80.873) C227B.2@49.104,80.873 v1(50.004,80.873) ; v1(48.204,85.073) C224B.1@49.104,85.073 v1(50.004,85.073) ; v1(48.24,63.833) C227A.2@49.14,63.833 v1(50.04,63.833) ; v1(48.24,68.033) C224A.1@49.14,68.033 v1(50.04,68.033) ; v1(48.548,55.871) v1(50.922,55.871) ; v1(48.699,28.498) v1(50.425,28.498) ; v1(48.699,29.298) v1(50.425,29.298) ; v1(48.944,49.532) v1(50.669,49.532) ; v1(48.944,50.332) v1(50.669,50.332) ; R23.1@50.545,96.275 v1(51.25,96.275) ; IC7.2@51.425,94.1 52.4,94.1 C245.1@53.025,94.725 ; v1(51.74,57.154) TR6B.2@52.927,57.154 ; TR6B.2@52.968,57.263 TR6B.2@52.987,57.243 ; v1(53.025,95.625) C245.1@53.025,94.725 ; v1(53.925,94.725) C245.1@53.025,94.725 ; v1(55.798,24.829) TR6A.4@56.985,24.829 ; v1(58.99,26.111) TR6A.2@60.177,26.111 ; v1(62.709,69.427) v1(64.459,69.427) ; v1(62.709,70.227) v1(64.459,70.227) ; v1(62.891,4.145) v1(65.541,4.145) ; v1(62.891,5.645) v1(65.541,5.645) ; v1(62.895,8.527) v1(62.895,10.277) ; v1(63.007,13.495) 64.186,13.495 64.524,13.157 v1(65.049,13.157) ; v1(63.007,15.2) C257.1@64.025,15.2 v1(65.043,15.2) ; v1(63.017,16.129) v1(65.049,16.129) ; v1(63.695,8.527) v1(63.695,10.277) ; C160.2@65.075,8.075 v1(65.75,8.075) ; v1(66.94,82.262) C86.1@67.36,82.262 ; C89.1@67.86,87.587 v1(67.86,88.007) ; C86.1@68.21,82.262 v1(68.63,82.262) ; C86.1@68.21,83.112 v1(68.63,83.112) ; C89.1@68.71,87.587 v1(68.71,88.007) ; v3(68.75,10.475) 69.4,9.825 IC25.12@71.1,9.825 v1(71.925,9.825) ; v1(70.875,86.475) C85.1@71.795,86.475 72.02,86.7 IC11.5@72.02,88.05 v1(72.02,89.48) ; C256.1@70.975,7.075 v1(70.975,7.725) ; v1(71.645,95.045) C84.1@71.645,94.025 72.02,93.65 IC11.4@72.02,92.45 v1(72.02,91.33) ; v1(72.67,91.33) IC11.3@72.67,92.45 ; IC5.1@72.868,21.835 72.868,22.585 v3(73.618,23.335) ; R168.1@73.05,14.425 R168.1@73.186,14.289 ; v1(73.611,13.742) 73.611,13.809 73.375,14.045 73.375,14.1 R168.1@73.186,14.289 ; v1(73.914,14.045) 73.67,14.289 R168.1@73.186,14.289 ; IC11.8@73.97,88.05 v1(73.97,89.48) ; v1(74.023,69.059) v1(74.023,70.809) ; v1(74.823,69.059) v1(74.823,70.809) ; v1(75.125,88.825) v1(75.125,90.525) ; v1(75.858,12.817) 75.881,12.839 75.881,13.74 IC35.2@75.904,13.763 ; v1(75.925,88.825) v1(75.925,90.525) ; C123.1@77.143,21.06 v1(77.718,21.06) ; C131.1@77.143,21.935 v1(77.718,21.935) ; v1(77.268,18.913) C340.1@77.268,18.088 v1(78.093,18.088) ; v1(78.168,63.1) v1(80.816,63.1) ; v1(78.168,63.85) v1(80.816,63.85) ; v1(78.168,64.6) v1(80.816,64.6) ; v1(78.168,66.55) v1(80.816,66.55) ; v1(78.168,67.3) v1(80.816,67.3) ; v1(78.168,68.05) v1(80.816,68.05) ; C339.1@78.619,15.822 C339.1@78.822,15.822 ; v1(78.822,16.725) C339.1@78.822,15.822 ; v1(79.444,15.8) 78.845,15.8 C339.1@78.822,15.822 ; v1(81.2,85.817) v1(81.2,88.467) ; v1(81.2,93.892) v1(81.2,96.542) ; v1(81.687,10.327) v1(83.723,10.327) ; v1(81.687,11.176) C348.1@82.705,11.176 v1(83.723,11.176) ; v1(81.687,12.025) C348.1@82.7,12.025 ; v1(81.95,85.817) C365.1@81.95,87.142 v1(81.95,88.467) ; v1(81.95,93.892) C364.2@81.95,95.217 v1(81.95,96.542) ; C348.1@82.7,11.349 C348.1@82.7,12.025 ; TP23.1@82.7,13.125 C348.1@82.7,12.025 ; v1(82.7,85.817) v1(82.7,88.467) ; v1(82.7,93.892) v1(82.7,96.542) ; C348.1@82.83,11.765 C348.1@82.83,12.025 ; v1(82.894,40.675) v1(82.894,43.325) ; v1(83.644,40.675) C305.2@83.644,42 v1(83.644,43.325) ; C306.1@83.718,46.75 v2(84.483,46.75) ; v1(83.723,12.025) C348.1@82.83,12.025 ; v1(83.862,60.606) C147.1@83.862,61.106 ; v1(84.394,40.675) v1(84.394,43.325) ; v2(84.443,65.875) C271.1@84.443,65.05 v1(85.268,65.05) ; R201.2@84.525,10.495 v1(84.525,11.176) ; v1(84.663,60.606) C158.1@84.663,61.106 ; v1(85.125,3.275) v1(86.875,3.275) ; v1(85.125,4.075) v1(86.875,4.075) ; v1(85.462,60.606) C159.1@85.462,61.106 ; v1(85.486,32.873) v1(87.522,32.873) ; v1(85.486,33.722) C269.1@86.504,33.722 v1(87.522,33.722) ; v1(85.486,34.571) v1(87.522,34.571) ; v1(85.629,23.222) v1(88.279,23.222) ; v1(85.629,23.972) C350.2@86.954,23.972 v1(88.279,23.972) ; v1(85.629,24.722) v1(88.279,24.722) ; C347.1@85.975,4.075 IC32.1@85.975,5.2 ; C265.2@86.654,30.597 v1(86.654,31.292) ; R36.2@88.12,65.527 v1(88.12,66.352) ; v1(88.232,19.814) v1(90.268,19.814) ; v1(88.232,20.663) C264.1@89.25,20.663 v1(90.268,20.663) ; v1(88.232,21.511) v1(90.268,21.511) ; v1(88.857,77.754) C42.1@89.743,77.754 ; v1(89.097,64.491) C303.1@89.697,64.491 ; v1(89.275,6.175) v1(89.275,7.925) ; v1(89.347,62.983) C291.1@89.847,62.983 ; v1(89.347,63.708) C297.1@89.847,63.708 ; v1(89.447,67.191) C302.1@90.272,67.191 v1(90.272,68.016) ; v1(90.075,6.175) v1(90.075,7.925) ; v1(90.105,15.305) R135.2@90.875,15.305 ; v1(90.45,85.817) v1(90.45,88.467) ; v1(90.45,93.892) v1(90.45,96.189) ; v1(91.2,85.817) C251.1@91.2,87.142 v1(91.2,88.467) ; v1(91.2,93.892) v1(91.2,96.189) ; v3(91.229,28.947) 91.879,28.297 IC19.12@93.579,28.297 94.279,28.297 v1(94.454,28.472) ; v1(91.6,20.3) v1(91.6,22.05) ; v1(91.95,85.817) v1(91.95,88.467) ; v1(91.95,93.892) v1(91.95,96.189) ; v1(91.997,65.341) v1(91.997,67.991) ; IC14.1@92.2,13.125 92.477,13.402 v1(92.477,14.075) ; v1(92.32,38.205) v1(92.32,40.855) ; v1(92.4,20.3) v1(92.4,22.05) ; v1(92.747,65.341) C301.2@92.747,66.666 v1(92.747,67.991) ; v1(92.927,82.339) IC29.3@93.777,82.339 ; v1(93.07,38.205) C319.2@93.07,39.53 v1(93.07,40.855) ; C367.1@93.429,25.222 v1(93.429,25.872) ; v1(93.497,65.341) v1(93.497,67.991) ; v1(93.525,87.192) v1(93.525,88.942) ; v1(93.525,93.417) v1(93.525,95.167) ; v1(93.82,38.205) v1(93.82,40.855) ; v1(93.955,35.306) 93.955,34.607 R181.1@93.961,34.6 ; v1(94.325,87.192) v1(94.325,88.942) ; v1(94.325,93.417) v1(94.325,95.167) ; TP20.1@94.5,78.034 96.923,78.034 97.18,78.291 v1@97.18,81.047 ; IC29.3@94.627,82.339 v1(96.113,82.339) ; v1(95.032,32.894) v1(97.068,32.894) ; v1(95.032,33.742) C191.1@96.05,33.742 v1(97.068,33.742) ; v1(95.032,34.591) v1(97.068,34.591) ; v1(95.177,38.83) C320.1@95.177,39.655 ; v1(95.525,14.025) v1(95.525,15.775) ; v1(95.813,38.83) C320.1@95.813,39.655 ; C313.1@96.02,43.28 v1(96.618,43.28) ; v1(96.05,22.861) C69.2@96.05,23.479 ; C321.1@96.195,42.455 v1(96.793,42.455) ; v1(96.325,14.025) v1(96.325,15.775) ; C361.1@97.108,82.023 97.153,82.068 v1(97.153,81.047) ; v1(97.575,14.05) v1(97.575,15.8) ; C161.1@97.739,84.877 97.78,84.836 98.44,84.836 v1(98.481,84.795) ; C101.1@97.95,42.363 v1(97.95,43.188) ; v1(98.375,14.05) v1(98.375,15.8) ; C101.1@98.585,42.363 v1(98.585,43.188) ; v1(99.15,24.5) v1(100.9,24.5) ; v2(99.15,25.3) v2(100.9,25.3) ; v1(100.787,72.207) C238.1@101.385,72.207 ; v1(101.3,88.992) v1(101.3,90.742) ; v1(101.325,91.592) v1(101.325,93.342) ; v2(101.651,43.307) 101.654,43.307 102.172,43.825 IC4.A5@102.175,43.825 ; v2(101.675,40.325) IC4.A2@102.175,40.825 ; v2(101.675,41.325) IC4.A3@102.175,41.825 ; v2(101.675,45.325) IC4.A7@102.175,45.825 ; v2(101.675,47.325) IC4.A9@102.175,47.825 ; v2(101.675,49.325) IC4.A11@102.175,49.825 ; v2(101.675,50.825) IC4.A12@102.175,50.825 ; TP17.1@102.026,17.627 102.525,17.128 102.525,16.173 C332.1@102.678,16.02 ; v1(102.033,16.02) C332.1@102.678,16.02 ; v1(102.1,88.992) v1(102.1,90.742) ; v1(102.125,91.592) v1(102.125,93.342) ; IC4.A22@102.175,60.825 v2(102.675,60.325) ; C195.1@102.525,26.946 v1(103.143,26.946) ; v2(102.675,41.325) IC4.B3@103.175,41.825 ; v2(102.675,50.825) IC4.B12@103.175,50.825 ; v2(102.675,57.325) IC4.B19@103.175,57.825 ; R256.1@102.825,28.132 v1(102.825,28.831) ; v2(103.675,41.325) IC4.C3@104.175,41.825 ; v2(103.675,44.325) IC4.C6@104.175,44.825 ; v2(103.675,55.325) IC4.C16@104.175,54.825 ; v2@103.689,48.317 IC4.C10@104.175,48.804 ; IC4.C12@104.175,50.825 v2(104.675,51.325) IC4.D12@105.175,50.825 ; IC28.5@104.353,15.12 IC28.7@104.353,16.162 104.212,16.02 C332.1@102.678,16.02 ; v1(104.569,66.506) C218.1@105.586,66.506 ; v1(104.569,67.355) C218.1@105.586,67.355 ; v1(104.569,68.204) C218.1@105.586,68.204 ; v2(104.675,41.325) IC4.D3@105.175,41.825 ; v2(104.675,42.325) IC4.D4@105.175,42.825 ; v2(104.675,46.325) IC4.D8@105.175,46.825 ; v2(104.675,52.325) IC4.D13@105.175,51.825 ; v2(105.675,42.325) IC4.E4@106.175,42.825 ; v2(105.675,43.325) IC4.E5@106.175,43.825 ; v2(105.675,45.325) IC4.E7@106.175,45.825 ; v2(105.675,47.325) IC4.E9@106.175,47.825 ; v2(105.675,49.325) IC4.E11@106.175,49.825 ; v2(105.675,51.325) IC4.E12@106.175,50.825 ; v1(105.728,12.928) v1(107.478,12.928) ; v1(105.728,13.728) v1(107.478,13.728) ; IC4.E20@106.183,58.833 106.183,59.272 106.285,59.373 ; v1(106.203,14.526) v1(106.203,16.276) ; v2(106.675,43.325) IC4.F5@107.175,43.825 ; v2(106.675,49.325) IC4.F11@107.175,49.825 ; v2(106.675,56.325) IC4.F17@107.175,55.825 ; 106.675,59.79 v2(106.675,60.325) ; v1(107.003,14.526) v1(107.003,16.276) ; v2(107.675,43.325) IC4.G5@108.175,43.825 ; v2(107.675,44.325) IC4.G6@108.175,44.825 ; v2(107.675,45.325) IC4.G7@108.175,45.825 ; v2(107.675,48.325) IC4.G10@108.175,48.825 ; v2(107.675,51.325) IC4.G12@108.175,50.825 ; v2(107.675,53.325) IC4.G14@108.175,52.825 ; IC4.G8@108.175,46.825 v2(107.675,47.325) IC4.G9@108.175,47.825 ; v1(108.253,16.242) C175.1@108.253,15.637 109.133,15.637 R129.1@109.153,15.657 109.358,15.862 IC9.11@110.078,15.862 111.378,15.862 IC9.11@111.628,16.112 ; v1(108.478,16.887) C172.1@109.128,16.887 ; v2(108.675,45.325) IC4.H7@109.175,45.825 ; v2(108.675,47.325) IC4.H9@109.175,47.825 ; v2(108.675,49.325) IC4.H11@109.175,49.825 ; v2(108.675,60.325) IC4.H21@109.175,59.825 ; v1(109.077,70.05) C278.1@109.675,70.05 ; C172.1@109.153,16.737 109.528,16.362 IC9.11@110.078,16.362 111.378,16.362 IC9.11@111.628,16.112 ; v2(109.675,46.325) IC4.J8@110.175,46.825 ; v2(109.675,48.325) IC4.J10@110.175,48.825 ; v2(109.675,51.325) IC4.J12@110.175,50.825 ; v2(109.675,57.325) IC4.J18@110.175,56.825 ; v2(110.675,43.325) IC4.K5@111.175,43.825 ; v2(110.675,45.325) IC4.K7@111.175,45.825 ; v2(110.675,49.325) IC4.K11@111.175,49.825 ; v2(110.675,54.325) IC4.K15@111.175,53.825 ; v1(110.775,6.855) R199.2@111.425,6.855 ; v1(111.425,20.111) C163.1@112.017,20.111 ; IC9.8@111.628,17.612 IC9.11@111.628,16.112 ; v2(111.663,40.15) 111.663,40.205 112.045,40.587 ; v2(111.675,46.325) IC4.L8@112.175,46.825 ; 112.045,40.593 112.175,40.724 IC4.L2@112.175,40.825 ; C176.1@112.128,12.812 C176.1@112.453,12.487 ; IC9.4@112.128,14.612 112.128,15.612 111.878,15.862 IC9.11@113.178,15.862 114.053,15.862 C174.1@114.303,16.112 ; v2(112.169,61.287) 112.169,60.831 IC4.L22@112.175,60.825 ; C176.1@112.728,12.537 v2(113.153,12.537) ; C176.1@112.728,13.087 v2(113.153,13.087) ; IC8.G1@112.841,21.72 IC8.G1@112.905,21.656 ; IC30.1@113.025,5.275 v1(113.025,6.175) ; IC4.M7@113.175,45.825 v2(113.675,45.325) ; IC4.M11@113.175,49.825 v2(113.675,49.325) ; IC4.M19@113.175,57.825 v2(113.675,58.325) ; v1(113.592,18.82) C177.1@113.592,19.411 ; C174.1@114.028,16.387 v2(114.028,16.812) ; IC4.N6@114.175,44.825 v2(114.675,44.325) ; IC4.N8@114.175,46.825 v2(114.675,46.325) ; IC4.N16@114.175,54.825 v2(114.675,55.325) ; v1(114.365,18.087) C169.1@114.365,18.678 ; C174.1@114.578,16.387 v2(114.578,16.812) ; v1(114.832,9.851) v1(116.868,9.851) ; v1(114.832,10.7) C344.1@115.85,10.7 v1(116.868,10.7) ; v1(114.832,11.549) v1(116.868,11.549) ; IC4.P3@115.175,41.825 v2(115.675,41.325) ; IC4.P7@115.175,45.825 v2(115.675,45.325) ; IC4.P9@115.175,47.825 v2(115.675,47.325) ; IC4.P11@115.175,49.825 v2(115.675,49.325) ; IC4.P13@115.175,51.825 v2(115.675,52.325) ; v1(115.24,18.542) R126.1@115.24,19.133 ; C173.1@115.403,16.387 v2(115.403,16.812) ; C173.1@115.628,15.862 C173.1@115.653,15.837 ; v1(115.95,90.567) v1(115.95,92.317) ; v2(115.953,16.812) 115.953,16.387 C173.1@115.678,16.112 C174.1@114.303,16.112 ; IC4.R8@116.175,46.825 v2(116.675,46.325) ; IC4.R10@116.175,48.825 v2(116.675,48.325) ; IC4.R12@116.175,50.825 v2(116.675,51.325) ; IC4.R20@116.175,58.825 v2(116.675,59.325) ; v1(116.3,6.025) v1(116.3,7.775) ; v1(116.75,90.567) v1(116.75,92.317) ; v1(117.1,6.025) v1(117.1,7.775) ; IC4.T7@117.175,45.825 v2(117.675,45.325) ; IC4.T9@117.175,47.825 v2(117.675,47.325) ; IC4.T11@117.175,49.825 117.648,49.352 v2(117.706,49.352) ; IC4.T17@117.175,55.825 v2(117.675,56.325) ; R43.1@117.984,68.49 v1(117.984,69.088) ; v1(118.125,6.025) v1(118.125,7.775) ; IC4.U4@118.175,42.825 v2(118.675,42.325) ; IC4.U14@118.175,52.825 v2(118.675,53.325) ; v1(118.925,6.025) v1(118.925,7.775) ; IC4.V1@119.175,39.825 v2(119.675,39.325) ; IC4.V11@119.175,49.825 v2(119.675,49.325) ; IC4.V21@119.175,59.825 v2(119.675,60.325) ; v1(119.242,18.564) C171.1@119.242,19.155 ; IC4.W8@120.175,46.825 v2(120.675,46.325) ; IC4.W18@120.175,56.825 v2(120.675,57.325) ; v2(120.665,22.103) 121.05,22.103 121.657,21.496 122.108,21.496 R123.1@122.195,21.409 R123.1@122.03,21.244 ; IC4.Y5@121.175,43.825 v2(121.675,43.325) ; IC4.Y15@121.175,53.825 v2(121.675,54.325) ; v1(121.445,68.377) T1.2@121.445,68.975 ; v1(121.575,84.58) J11.1@123.2,84.58 v1(124.825,84.58) ; v1(121.575,88.39) J11.4@123.2,88.39 v1(124.825,88.39) ; v1(121.575,92.2) J11.7@123.2,92.2 v1(124.825,92.2) ; v2(122.172,61.325) 122.172,60.828 IC4.AA22@122.175,60.825 ; IC4.AA2@122.175,40.825 v2(122.675,40.325) ; IC4.AA12@122.175,50.825 v2(122.675,51.325) ; v1(122.645,68.993) R190.2@122.645,68.395 123.795,68.395 123.995,68.595 T15.2@123.995,68.625 ; v1(122.782,16.651) v1(124.818,16.651) ; v1(122.782,17.5) C336.1@123.8,17.5 v1(124.818,17.5) ; v1(122.782,18.349) v1(124.818,18.349) ; IC4.AB9@123.175,47.825 123.184,47.825 123.665,47.344 123.755,47.344 v2(123.774,47.325) ; IC4.AB19@123.175,57.825 123.203,57.853 v2(123.706,57.853) ; v1(123.43,12.425) R197.2@124.05,12.425 ; v1(124.07,69.527) C279.1@124.07,70.125 ; C232.1@124.95,16.05 v1(125.425,16.05) ; R241.2@125.145,22.425 v1(125.765,22.425) ; IC20.1@125.5,11.125 v1(125.5,12.1) ; v1(126.1,15.35) v1(127.85,15.35) ; v1(126.1,16.15) v1(127.85,16.15) ; v1(126.1,17.35) v1(127.85,17.35) ; v1(126.1,18.15) v1(127.85,18.15) ; v1(126.125,19.6) IC31.1@126.825,19.6 ; R186.2@126.445,69.9 v2(126.445,70.725) ; v1(127.457,32.375) C235.1@128.475,32.375 ; v1(128.029,40.449) C91.2@128.029,41.467 ; C91.2@128.04,42.638 v1(128.04,43.656) ; v1(128.17,59.042) C56.1@128.17,60.06 ; C235.1@128.326,32.4 v1(128.326,33.418) ; v1(128.563,78.145) 128.589,78.118 129.219,78.118 R261.2@129.246,78.091 ; R189.2@128.579,74.9 128.579,74.147 v2(128.58,74.146) ; v1(128.85,12.075) v1(128.85,13.825) ; v1(128.857,29.394) v1(130.893,29.394) ; v1(128.857,30.243) C260.1@129.875,30.243 v1(130.893,30.243) ; v1(128.857,31.092) v1(130.893,31.092) ; v1(128.878,40.449) C91.2@128.878,41.467 ; C91.2@128.889,42.638 v1(128.889,43.656) ; v1(128.925,50.532) C94.1@129.75,50.532 ; v1(128.925,51.168) C94.1@129.75,51.168 ; v1(128.95,52.232) C93.1@129.775,52.232 ; v1(129.019,59.042) C56.1@129.019,60.06 ; C235.1@129.175,32.4 v1(129.175,33.418) ; v1(129.65,12.075) v1(129.65,13.825) ; v1(129.727,40.449) C91.2@129.727,41.467 ; C91.2@129.738,42.638 v1(129.738,43.656) ; C149.1@129.739,55.753 129.739,55.723 130.089,55.373 130.49,55.373 v1(131.054,54.809) ; v1(129.868,59.042) C56.1@129.868,60.06 ; C235.1@129.875,32.375 v1(130.893,32.375) ; C235.1@130.024,32.4 v1(130.024,33.418) ; C59.1@130.175,36.882 v1(131,36.882) ; C59.1@130.175,37.518 v1(131,37.518) ; v1(130.825,12.075) v1(130.825,13.825) ; v1(131.05,84.575) J10.1@132.675,84.575 v1(134.3,84.575) ; v1(131.05,88.385) J10.4@132.675,88.385 v1(134.3,88.385) ; v1(131.05,92.195) J10.7@132.675,92.195 v1(134.3,92.195) ; R242.2@131.231,78.087 v1(131.231,78.684) ; v1(131.625,12.075) v1(131.625,13.825) ; R243.2@132.231,78.091 v1(132.231,78.689) ; v1(133.275,7.425) R164.1@133.905,7.425 ; T10.1@133.55,6.175 v1(133.55,6.7) ; R244.1@134.092,78.07 v1(134.092,78.668) ; v1(134.925,4.875) T10.4@135.75,4.875 ; v1(134.942,66.693) D8.1@135.735,66.693 ; v1(136.382,7.476) v1(138.418,7.476) ; v1(136.382,8.325) C139.1@137.4,8.325 v1(138.418,8.325) ; v1(136.382,9.174) v1(138.418,9.174) ; C58.1@137.278,78.873 v1(137.278,79.891) ; C58.1@138.127,78.873 v1(138.127,79.891) ; v1(138.876,13.332) v1(138.876,15.368) ; C58.1@138.975,78.873 v1(138.975,79.891) ; v1(139.725,13.332) C178.1@139.725,14.35 v1(139.725,15.368) ; v1(140.574,13.332) v1(140.574,15.368) ; v1(141.1,58.075) J9.14@142.225,58.075 v1(143.35,58.075) ; v1(141.1,59.98) J9.8@142.225,59.98 v1(143.35,59.98) ; v1(141.1,61.885) J9.2@142.225,61.885 v1(143.35,61.885) ; v1(141.316,55.781) 141.364,55.829 141.364,55.909 141.625,56.17 v1(143.35,56.17) ; v1(141.443,78.156) TP21.1@143.077,78.156 ; C268.1@141.905,69.328 v1(143.052,69.328) ; TP22.1@142.1,44.577 v1(143.748,44.577) ; IC33.6@142.9,50.29 144.337,50.29 v1(144.49,50.443) 144.61,50.563 144.61,50.94 ; v1(143.85,81.875) J8.1@145.625,81.875 J8.1@145.835,82.085 ; v1(143.85,83.875) J8.3@145.625,83.875 v1(147.4,83.875) ; v1(143.85,85.875) J8.5@145.625,85.875 v1(147.4,85.875) ; v1(143.85,87.875) J8.7@145.625,87.875 v1(147.4,87.875) ; v1(143.85,91.875) J8.11@145.625,91.875 v1(147.4,91.875) ; v1(143.85,93.875) J8.13@145.625,93.875 v1(147.4,93.875) ; v1(143.867,89.892) 145.608,89.892 J8.9@145.625,89.875 v1(147.4,89.875) ; IC22.31@144.45,5.375 144.45,4.122 R19.1@144.378,4.05 v1(145.125,4.05) ; v1(144.45,37.128) 144.518,37.128 144.598,37.048 144.95,37.048 D7.1@145.325,36.673 ; v1(144.7,56.17) J9.19@145.825,56.17 v1(146.95,56.17) ; v1(144.7,58.075) J9.13@145.825,58.075 v1(146.95,58.075) ; v1(144.7,59.98) J9.7@145.825,59.98 v1(146.95,59.98) ; v1(144.7,61.885) J9.1@145.825,61.885 v1(146.95,61.885) ; IC6.2@146.475,21.6 v1(147.375,21.6) ; IC13.2@146.475,30.65 v1(147.375,30.65) ; C10.1@147.9,19.35 v1(147.9,19.95) ; C242.1@147.9,28.4 v1(147.9,29) ; C182.1@148.575,14.125 v1(148.575,14.775) ; D5.1@148.939,25.353 149.966,25.353 v1(149.975,25.344) ; IC22.42@149.75,6.675 150.275,6.675 v1(150.55,6.4) ; IC22.45@149.75,8.175 149.775,8.2 150.5,8.2 150.7,8.4 v1(150.75,8.4) ; v1(151.425,11.275) v1(151.425,13.025) ; C331.1@151.725,8.3 v1(152.425,8.3) ; v1(152.225,11.275) v1(152.225,13.025) ; v1(153.4,11.275) v1(153.4,13.025) ; v1(153.524,74.687) 154.229,74.687 LD19.1@154.291,74.75 ; v1(154.2,11.275) v1(154.2,13.025) ; LD11.1@154.267,73.593 LD20.1@154.267,72.233 154.948,71.553 155.261,71.553 LD21.2@155.941,70.873 157.778,70.873 v1(157.915,71.01) ; C348.1@82.7,12.025 C348.1@82.83,12.025 ; IC9.11@111.628,16.112 111.878,16.362 IC9.11@113.178,16.362 114.053,16.362 C174.1@114.303,16.112
  TopLayer w0.254: v1(48.237,56.801) 48.237,57.396 R193B.1@48.258,57.375 ; TR6B.2@52.89,57.191 53.14,56.941 54.227,56.941 54.437,56.731 54.577,56.731 v1(55.037,57.191) 54.627,57.601 C281B.2@54.462,57.601 54.252,57.391 53.165,57.391 TR6B.2@52.915,57.141 ; v1(55.487,25.759) R193A.1@55.487,26.354 R193A.1@55.614,26.226 ; TR6A.2@60.14,26.149 60.39,25.899 61.477,25.899 C280A.1@61.687,25.689 61.827,25.689 v1(62.287,26.149) 61.877,26.559 C281A.2@61.712,26.559 61.502,26.349 60.415,26.349 TR6A.2@60.165,26.099
  TopLayer w0.3: v1(63.045,71.33) 63.05,71.325 C18.1@63.875,71.325 ; v1(63.41,87.412) C88.1@63.41,88.067 ; v1(63.595,65.93) 63.6,65.925 C55.1@64.425,65.925 64.425,66.75 v1(64.43,66.755) ; v1(64.105,80.257) 64.1,80.252 C17.1@64.1,79.427 v1@64.925,79.427 ; IC1.5@66.1,74.3 IC1.29@67.85,74.3 ; IC1.4@66.1,74.8 67.85,74.8 IC1.29@67.975,74.675 ; IC12.4@66.61,84.562 66.685,84.487 66.685,83.787 67.235,83.237 67.41,83.237 67.785,82.862 C86.1@67.785,82.687 ; IC1.28@66.85,77.05 66.85,76.3 IC1.29@68.1,75.05 ; IC24.2@67.05,64.375 67.05,65.2 v1(67.055,65.205) ; IC1.10@67.35,72.05 67.35,73.8 IC1.29@67.85,74.3 ; v1(67.425,96.13) RN1.4@68.65,96.13 v1(69.875,96.13) ; IC1.23@69.35,77.05 69.35,76.3 IC1.29@68.1,75.05 ; C6.1@70.175,79.925 70.175,80.75 v1(70.18,80.755) ; C7.1@70.325,68.575 71.15,68.575 v1(71.155,68.57) ; v1(71.645,69.32) 71.65,69.325 C21.1@71.65,70.15 ; v1(72.92,69.32) 72.925,69.325 C20.1@72.925,70.15 ; v3(98.85,28.939) 99.5,28.289 IC36.12@101.2,28.289 102.667,28.289 R256.1@102.825,28.132 ; v1(105.498,73.03) 105.5,73.028 IC27.10@105.5,71.75 ; IC8.B9@108.829,28.132 IC8.B9@108.841,28.12 ; v2(108.829,29.113) v2@108.839,29.103 ; IC4.H1@109.175,39.825 v2@109.69,39.31 ; R192.2@118.595,71.875 118.595,71.855 118.735,71.715 119.019,71.715 119.057,71.677 119.321,71.677 v1(119.36,71.639) ; IC17.7@118.95,73.45 v1(118.95,74.6) ; v1(125.395,78.05) IC10.4@125.395,79.2 ; IC1.29@67.85,74.3 67.975,74.425 IC1.29@67.975,74.675 ; IC1.29@67.975,74.675 67.975,74.925 IC1.29@68.1,75.05
  TopLayer w0.5: IC23.1@113.425,91.317 113.55,91.442 C249.1@116.35,91.442